# Altium PCB Motion Control PCB.PcbDoc (part 1 of 2)
Units mm, origin at the board's own origin, x right, y up, seen from the top; angles counter-clockwise.
Board outline 100 x 60 mm, 4 copper layers (Top Layer, Signal Layer 1, Signal Layer 2, Bottom Layer), stack 1.642 mm thick; 129 components, 65 nets, 423 pads, 398 vias.
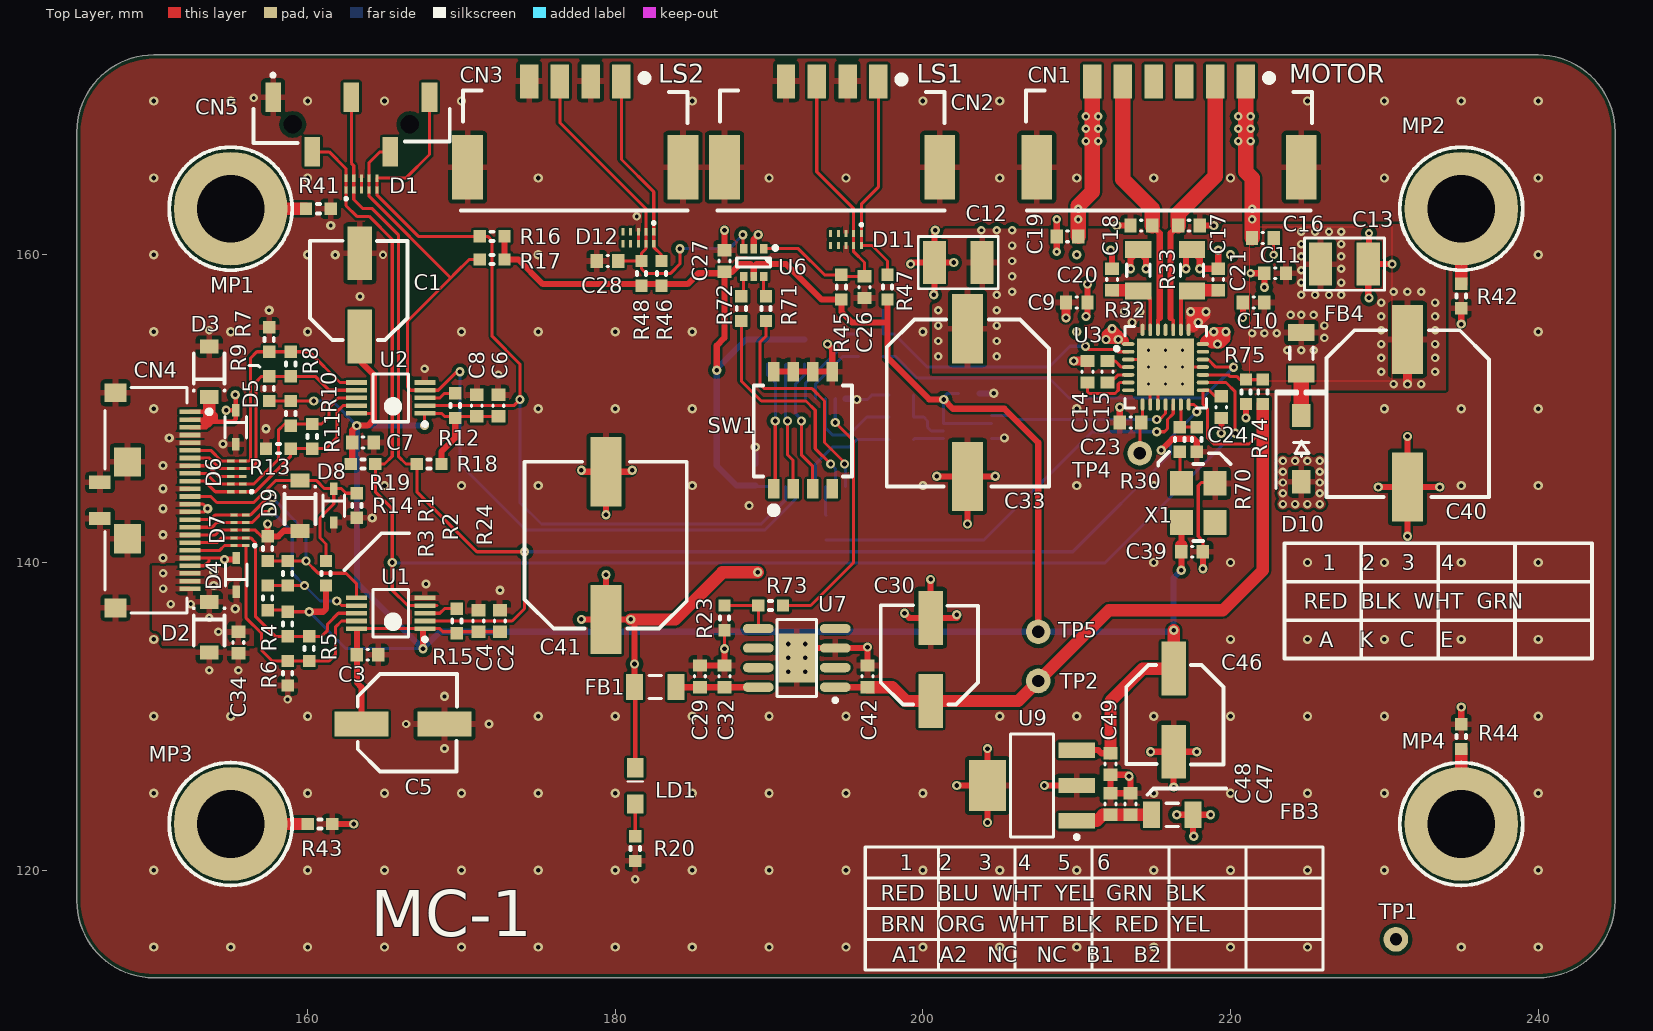
[diagram p0: Top Layer view]
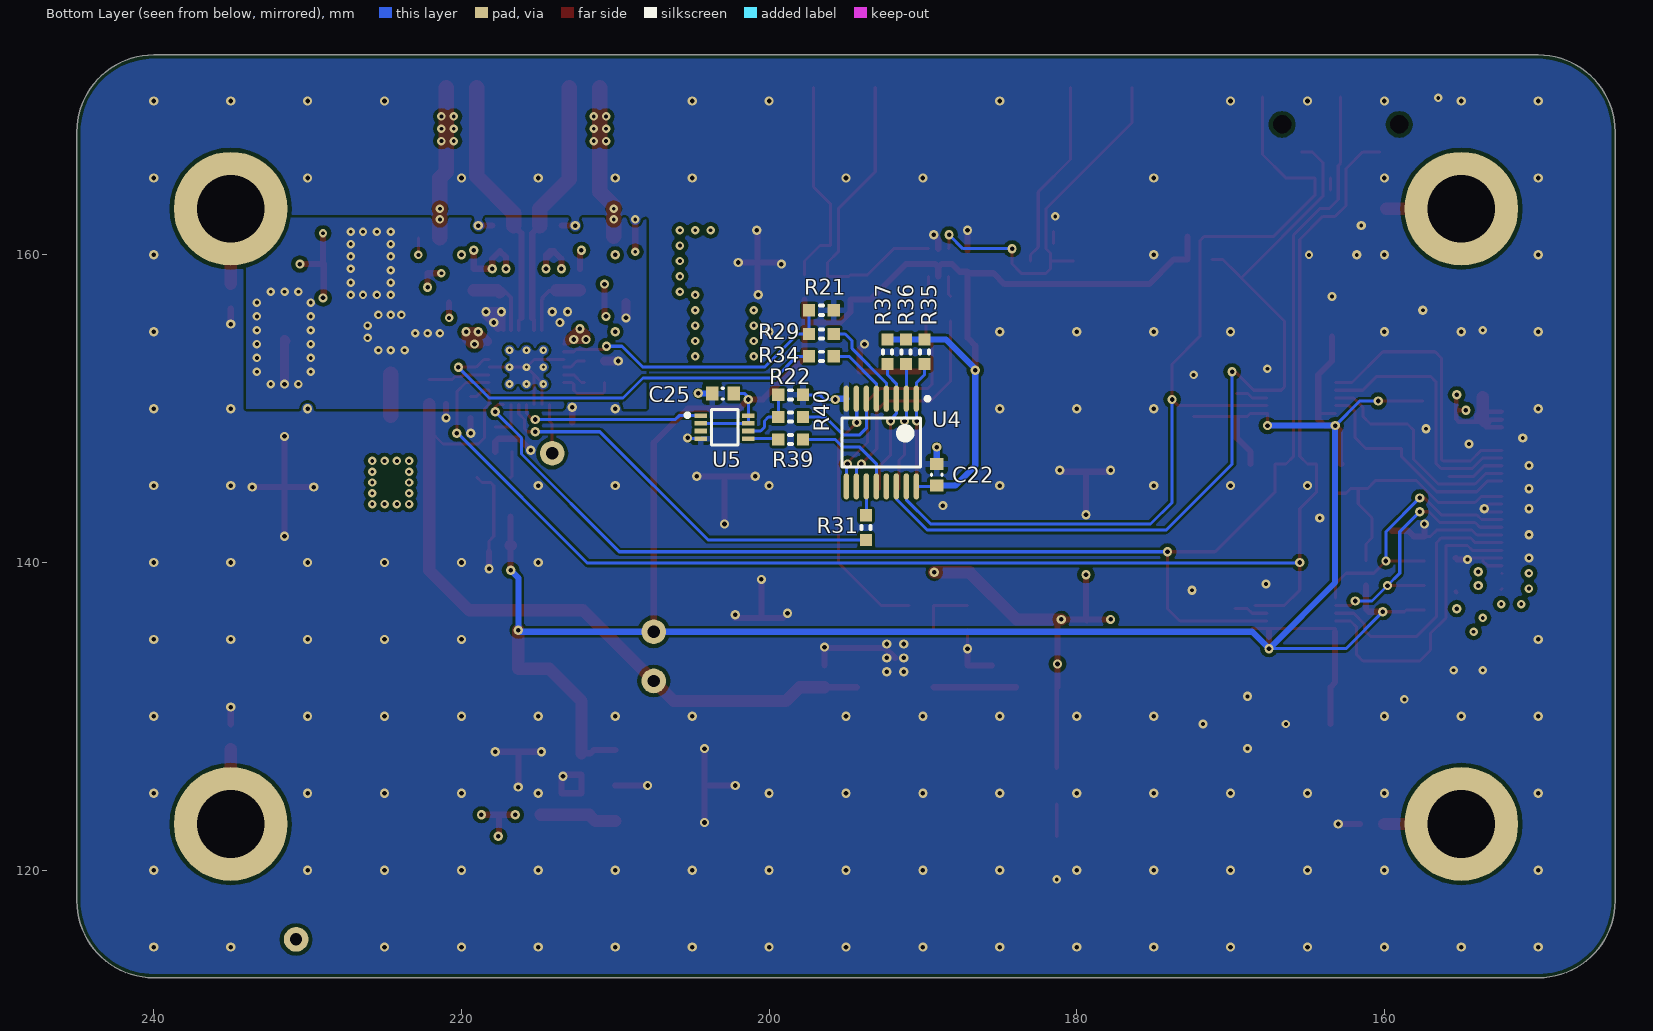
[diagram p1: Bottom Layer view, seen from below]
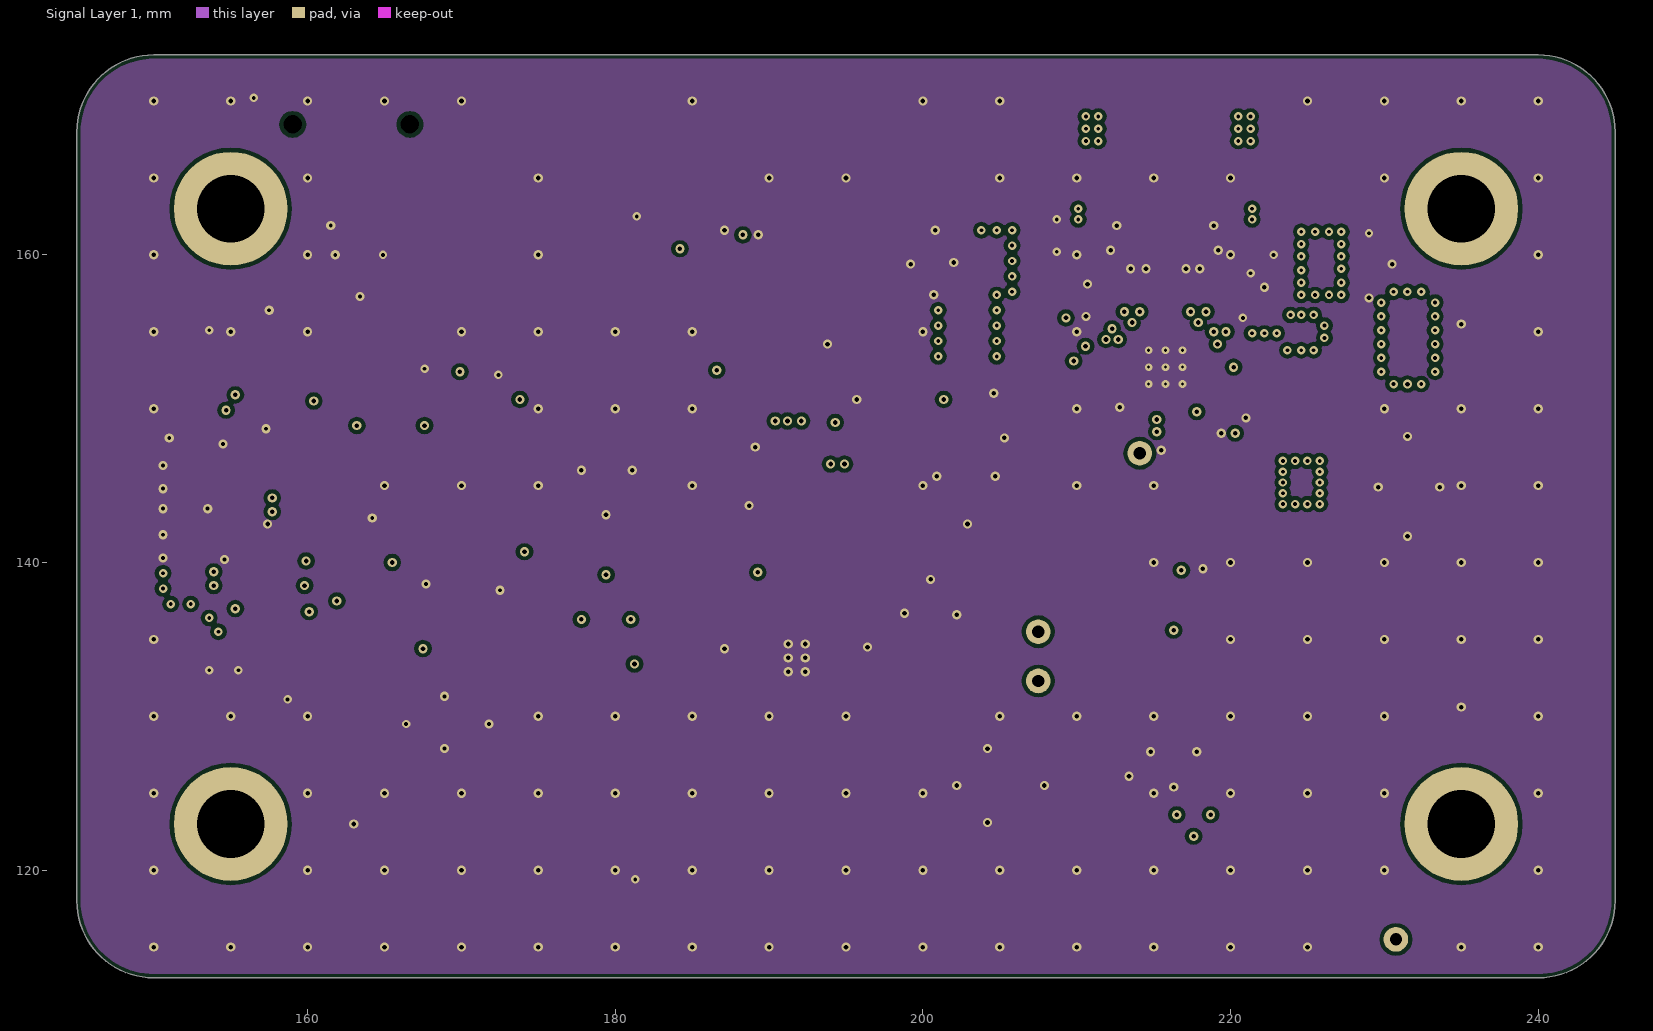
[diagram p2: Signal Layer 1]
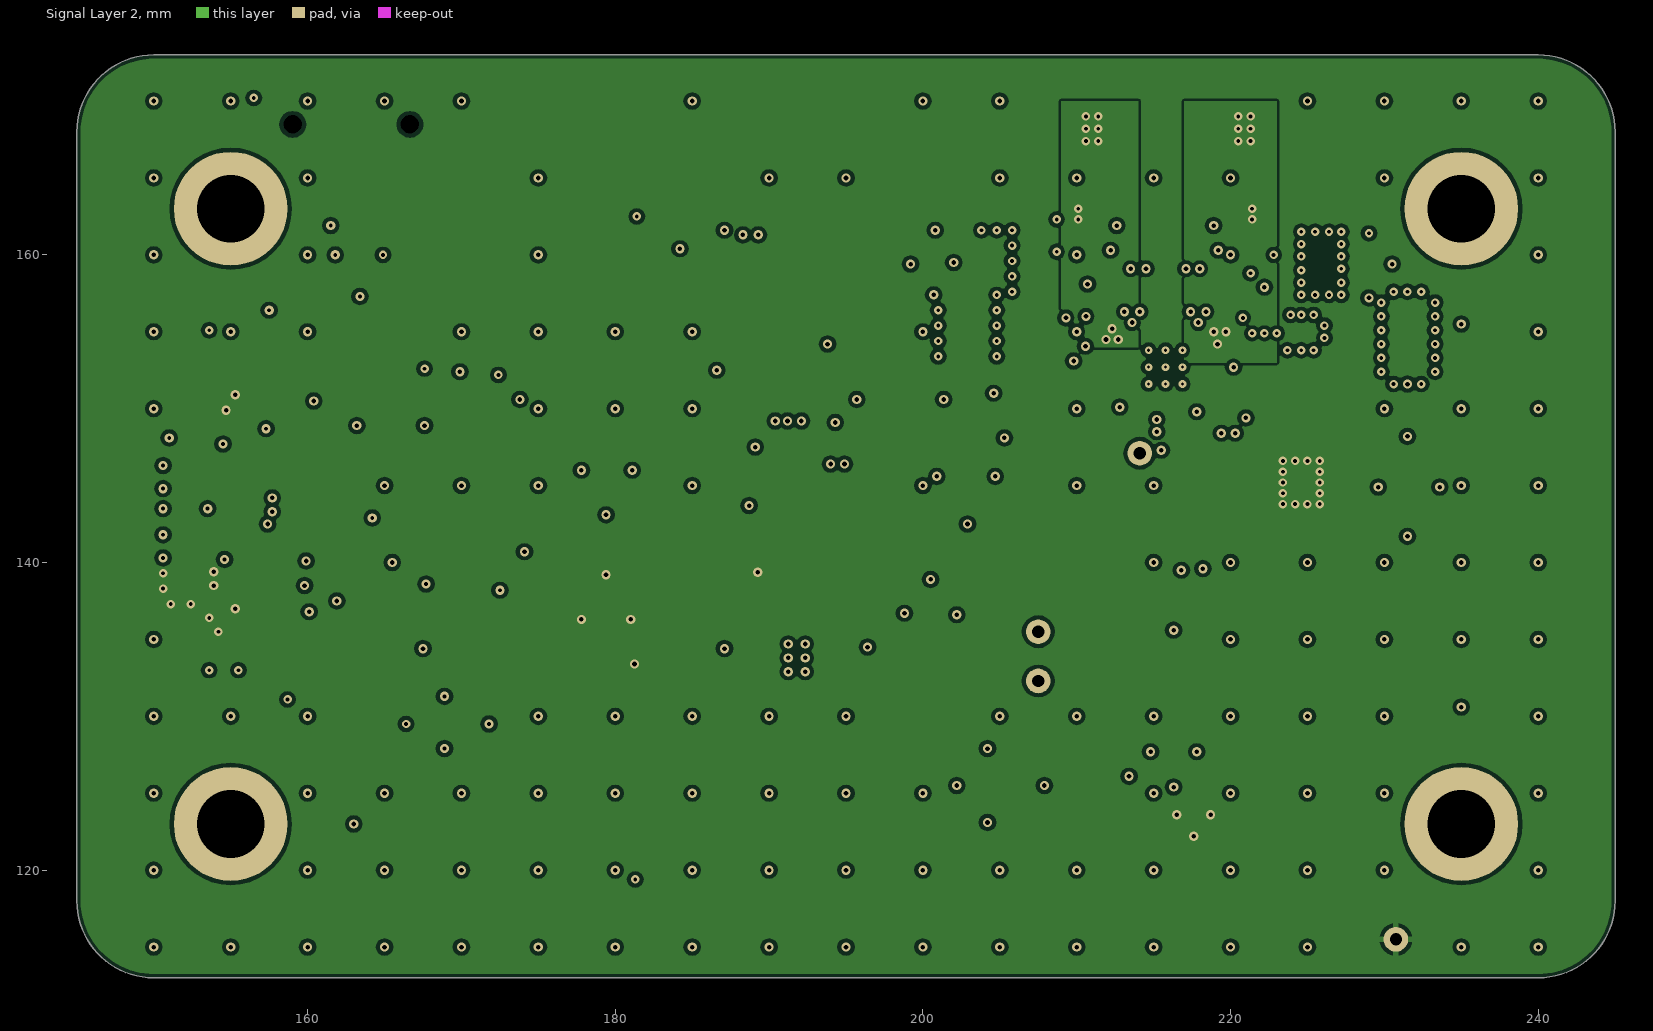
[diagram p3: Signal Layer 2]
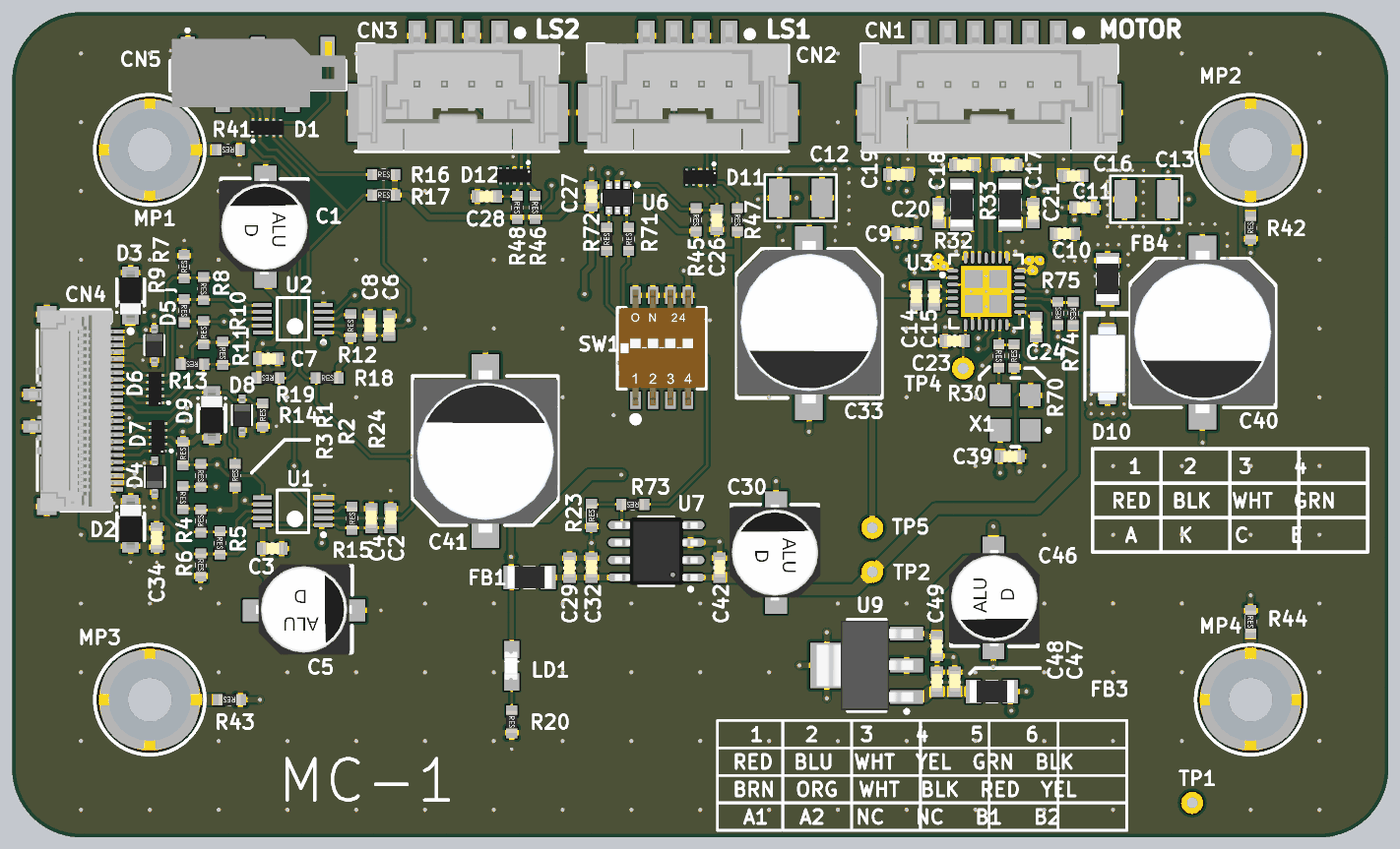
[diagram p5: 3D render of the assembled board from above, using the file's embedded part models]
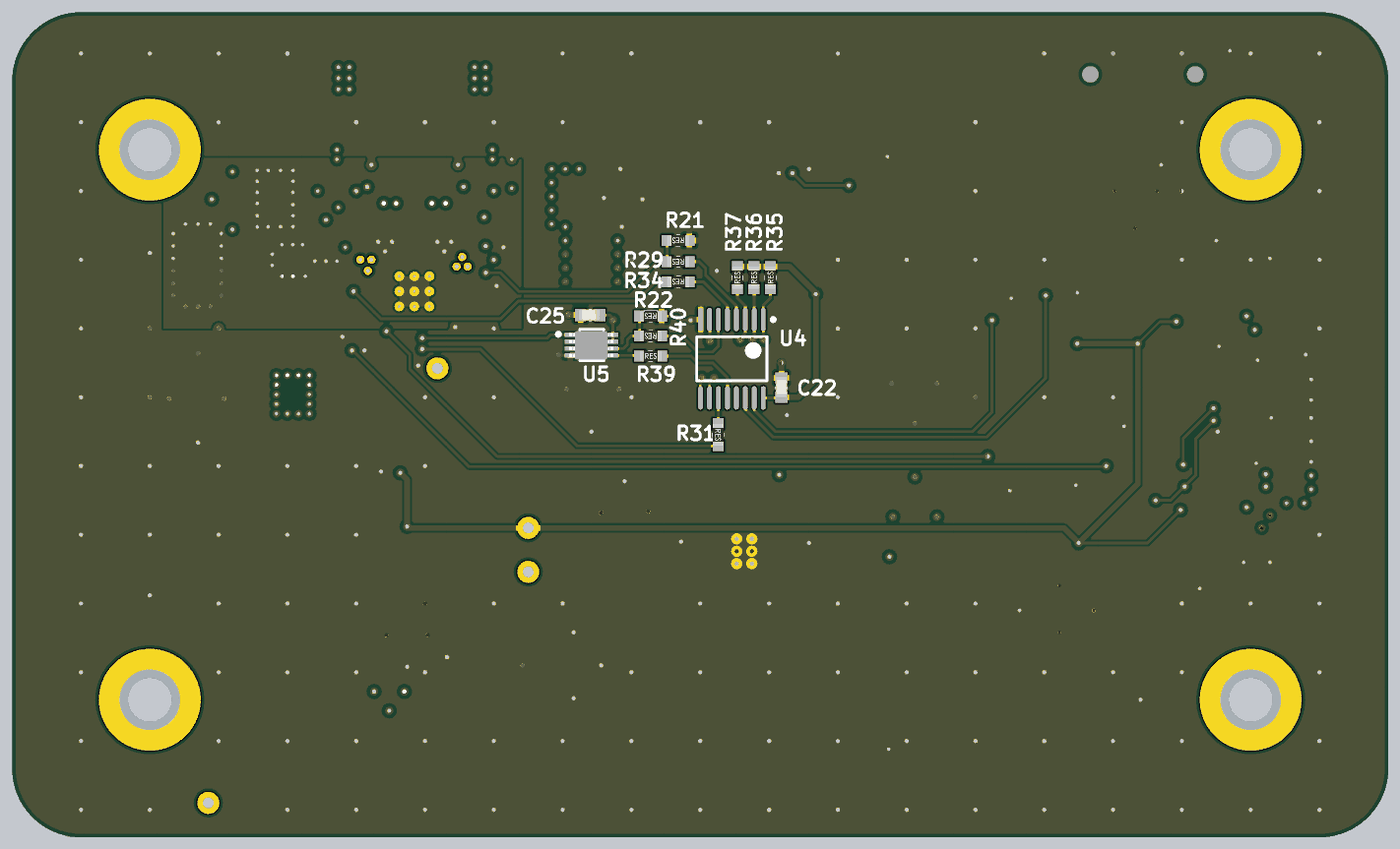
[diagram p6: 3D render of the assembled board from below, using the file's embedded part models]

## Layer stack, top to bottom
Top Solder: solder mask 0.025, Solder Resist, Dk 3.5
Top Layer: signal copper 0.036
Dielectric 1: core 0.17, FR-4, Dk 4.2
Signal Layer 1: signal copper 0.018
Dielectric 3: prepreg 1.194, Dk 4.2
Signal Layer 2: signal copper 0.018
Dielectric 2: core 0.17, Dk 4.2
Bottom Layer: signal copper 0.036
Bottom Solder: solder mask 0.025, Solder Resist, Dk 3.5

## Board outline
145,118 145,168 cw(c150,168) 150,173 240,173 cw(c240,168) 245,168 245,118 cw(c240,118) 240,113 150,113 cw(c150,118)

## Design rules (kind name [scope] priority, off if disabled: settings)
BoardOutlineClearance [All] p1: gap=0.254 ignorepadtopadclearanceinfootprint=FALSE except(0: Arc-SplitContinuation Track-SplitContinuation SMDPad-SplitContinuation THPad-SplitContinuation Via-SplitContinuation Fill-SplitContinuation Poly-SplitContinuation Region-SplitContinuation Text-SplitContinuation)
Clearance Clearance_Hole_Copper [PadXSize_AllLayers <= HoleDiameter] p1: gap=0.254 ignorepadtopadclearanceinfootprint=FALSE except(0: Arc-Hole Track-Hole SMDPad-Hole THPad-Hole Via-Hole Fill-Hole Poly-Hole Region-Hole Text-Hole)
Clearance [All] p2: gap=0.15 ignorepadtopadclearanceinfootprint=FALSE except(0: Arc-Hole Track-Hole SMDPad-Hole THPad-Hole Via-Hole Fill-Hole Poly-Hole Region-Hole Text-Hole; 0.2: Arc-THPad Arc-Via Track-THPad Track-Via SMDPad-THPad SMDPad-Via THPad-THPad THPad-Via Via-Via; 0.254: THPad-Poly Via-Poly Fill-Poly)
DiffPairsRouting [All] p1: maxlimit=0.254 minlimit=0.191 mostfreqgap=0.191 toplayer_mingap=0.191 toplayer_maxgap=0.191 toplayer_minwidth=0.191 toplayer_maxwidth=0.191 toplayer_prefwidth=0.191 midlayer1_prefgap=0.191 midlayer1_minwidth=0.191 midlayer1_maxwidth=0.381 midlayer1_prefwidth=0.191 midlayer2_prefgap=0.191 midlayer2_minwidth=0.191 midlayer2_maxwidth=0.381 midlayer2_prefwidth=0.191 bottomlayer_mingap=0.191 bottomlayer_maxgap=0.191 bottomlayer_minwidth=0.191 bottomlayer_maxwidth=0.191 bottomlayer_prefwidth=0.191 maxuncoupledlength=12.7
HoleSize [All] p1: absolutevalues=TRUE maxlimit=5 minlimit=0.2 maxpercent=80.000 minpercent=20.000
HoleToHoleClearance [All] p1 off: gap=0.254 allowstackedmicrovias=TRUE
MinimumSolderMaskSliver [All] p1 off: minsoldermaskwidth=0.254
NetAntennae [All] p1 off: netantennaetolerance=0
PlaneConnect [All] p1: planeconnectstyle=Relief reliefexpansion=0.2 reliefentries=4 reliefconductorwidth=0.2 reliefairgap=0.15
PolygonConnect PolygonConnect_GND-Vias [IsVia] p1: connectstyle=Direct reliefconductorwidth=0.254 reliefentries=4 polygonreliefangle="90 Angle" airgapwidth=0.254
PolygonConnect [All] p2: connectstyle=Relief reliefconductorwidth=0.4 reliefentries=4 polygonreliefangle="90 Angle" airgapwidth=0.254
RoutingVias [All] p1: holewidth=0.3 width=0.6 viastyle="Through Hole" minholewidth=0.2 minwidth=0.4 maxholewidth=0.3 maxwidth=0.6
SilkToSilkClearance [All] p1 off: silktosilkclearance=0.254
SilkToSolderMaskClearance [IsPad] p1 off: minsilkscreentomaskgap=0.254 clearancetoexposedcopper=TRUE
SolderMaskExpansion [All] p1: expansion=0.102
Width [All] p1: maxlimit=1 minlimit=0.15 preferedwidth=0.2 toplayer_prefwidth=0.15 midlayer1_minwidth=0.2 midlayer2_minwidth=0.2 bottomlayer_prefwidth=0.15 minimp=50.000000 maximp=50.000000 favimp=50.000000
22 further rules are at their usual default settings.

## Classes and differential pairs
component class "Level Shifters": C1 C2 C3 C4 C5 C6 C7 C8 CN5 D1 R1 R2 R3 R4 R5 R6 R7 R8 R9 R10 R11 R12 R13 R15 R16 R17 R18 R19 U1 U2
component class Motion: C9 C10 C11 C12 C13 C14 C15 C16 C17 C18 C19 C20 C21 C22 C23 C24 C25 C33 C39 C40 CN1 D10 FB4 MP1 MP2 MP3 MP4 R21 R22 R29 R30 R31 R32 R33 R34 R35 R36 R37 R39 R40 R41 R42 R43 R44 R70 R74 R75 SW1 TP4 U3 U4 U5 X1
component class "Opto Sensors": C26 C27 C28 CN2 CN3 D11 D12 R45 R46 R47 R48 R71 R72 U6
component class "Power Supplies": C29 C30 C32 C42 C46 C47 C48 C49 FB1 FB3 R23 R73 TP1 TP2 TP5 U7 U9
component class Connector: C34 C41 CN4 D2 D3 D4 D5 D6 D7 D8 D9 LD1 R14 R20 R24

## Components (designator, comment, footprint, x,y, rotation, side; value= is the part's Value field where it differs from the comment)
C1 "47uF 25V Aluminium SMD Capacitor, 20%" RADIAl-CAN-6.3MM-DIA 163.4,157.4 r180 top value=47uF
C2 "4.7uF 0603 Ceramic Capacitor, 10%, 25V" C0603 172.5,136.2 r270 top value=4.7uF
C3 "100nF 0603 Ceramic Capacitor, 10%, X7R, 50V" C0603 163.9,134 r180 top value=100nF
C4 "100nF 0603 Ceramic Capacitor, 10%, X7R, 50V" C0603 171.1,136.2 r270 top value=100nF
C5 "47uF 25V Aluminium SMD Capacitor, 20%" RADIAl-CAN-6.3MM-DIA 166.2,129.5 r90 top value=47uF
C6 "4.7uF 0603 Ceramic Capacitor, 10%, 25V" C0603 172.4,150.2 r270 top value=4.7uF
C7 "100nF 0603 Ceramic Capacitor, 10%, X7R, 50V" C0603 163.6,147.8 r180 top value=100nF
C8 "100nF 0603 Ceramic Capacitor, 10%, X7R, 50V" C0603 171,150.2 r270 top value=100nF
C9 "100nF 0603 Ceramic Capacitor, 10%, X7R, 50V" C0603 210,156.9 r180 top value=100nF
C10 "100nF 0603 Ceramic Capacitor, 10%, X7R, 50V" C0603 221.5,156.9 r0 top value=100nF
C11 "1uF 0603 Ceramic Capacitor, 10%, 50V, X5R" C0603 222.9,158.8 r0 top value=1uF
C12 "10uF 1210 Ceramic Capacitor, 10%, 35V" CAPC3225X22M 202.3,159.5 r180 top value=10uF
C13 "10uF 1210 Ceramic Capacitor, 10%, 35V" CAPC3225X22M 227.4,159.4 r0 top value=10uF
C14 "100nF 0603 Ceramic Capacitor, 10%, X7R, 50V" C0603 210.7,152.4 r90 top value=100nF
C15 "22nF 0603 Ceramic Capacitor, 5%, NP0, 50V" C0603 212,152.4 r90 top value=22nF
C16 "470pF 0603 Ceramic Capacitor, 5%, 100V, C0G" C0603 222.1,161.1 r180 top value=470pF
C17 "470pF 0603 Ceramic Capacitor, 5%, 100V, C0G" C0603 217.3,161.9 r180 top value=470pF
C18 "470pF 0603 Ceramic Capacitor, 5%, 100V, C0G" C0603 214.2,161.9 r0 top value=470pF
C19 "470pF 0603 Ceramic Capacitor, 5%, 100V, C0G" C0603 209.4,161.2 r0 top value=470pF
C20 "100nF 0603 Ceramic Capacitor, 10%, X7R, 50V" C0603 212.3,158.4 r270 top value=100nF
C21 "100nF 0603 Ceramic Capacitor, 10%, X7R, 50V" C0603 219.2,158.4 r270 top value=100nF
C22 "100nF 0603 Ceramic Capacitor, 10%, X7R, 50V" C0603 189.1,145.7 r270 bottom value=100nF
C23 "4.7uF 0603 Ceramic Capacitor, 10%, 25V" C0603 213.5,149.1 r0 top value=4.7uF
C24 "100nF 0603 Ceramic Capacitor, 10%, X7R, 50V" C0603 219.4,150.1 r90 top value=100nF
C25 "100nF 0603 Ceramic Capacitor, 10%, X7R, 50V" C0603 203,150.979 r180 bottom value=100nF
C26 "100nF 0603 Ceramic Capacitor, 10%, X7R, 50V" C0603 196.2,157.9 r90 top value=100nF
C27 "100nF 0603 Ceramic Capacitor, 10%, X7R, 50V" C0603 187.1,159.6 r270 top value=100nF
C28 "100nF 0603 Ceramic Capacitor, 10%, X7R, 50V" C0603 179.5,159.6 r0 top value=100nF
C29 "4.7uF 0603 Ceramic Capacitor, 10%, 25V" C0603 185.5,132.6 r270 top value=4.7uF
C30 "CAP ALUM 270UF 20% 16V SMD" RADIAl-CAN-6.3MM-DIA 200.5,133.7 r180 top value=270uF
C32 "100nF 0603 Ceramic Capacitor, 10%, X7R, 50V" C0603 187.1,132.6 r270 top value=100nF
C33 "HYBRID SMD, 35V390UF 125DEGC 400" RADIAl-CAN-10MM-DIA 202.9,150.4 r0 top value=390uF
C34 "100nF 0603 Ceramic Capacitor, 10%, X7R, 50V" C0603 155.5,134.8 r90 top value=100nF
C39 "100nF 0603 Ceramic Capacitor, 10%, X7R, 50V" C0603 217.5,140.7 r180 top value=100nF
C40 "HYBRID SMD, 35V390UF 125DEGC 400" RADIAl-CAN-10MM-DIA 231.5,149.7 r0 top value=390uF
C41 "HYBRID SMD, 35V390UF 125DEGC 400" RADIAl-CAN-10MM-DIA 179.4,141.1 r180 top value=390uF
C42 "100nF 0603 Ceramic Capacitor, 10%, X7R, 50V" C0603 196.4,132.6 r270 top value=100nF
C46 "CAP ALUM 270UF 20% 16V SMD" RADIAl-CAN-6.3MM-DIA 216.3,130.4 r0 top value=270uF
C47 "0.47uF 0603 Ceramic Capacitor, 10%, 25V, X7R" C0603 213.5,124.3 r270 top value=0.47uF
C48 "100nF 0603 Ceramic Capacitor, 10%, X7R, 50V" C0603 212.2,124.3 r270 top value=100nF
C49 "100nF 0603 Ceramic Capacitor, 10%, X7R, 50V" C0603 212.2,126.9 r90 top value=100nF
CN1 "560020-0620" 5600200620 216,171.28 r0 top
CN2 "560020-0420" 5600200420 194.1,171.28 r0 top
CN3 "560020-0420" 5600200420 177.4,171.28 r0 top
CN4 "5022442430" 5022312400 152.36,144.04 r270 top
CN5 "1x5 Way 2.54mm Pitch SMT Socket" SSM-105-L-SV-P-TR 162.84,168.477 r0 top
D1 "TVS DIODE 5.5V 4.6V 10DFN2510" DFN2510A-10 163.5,164.6 r0 top
D2 "AQHV15-01ETG" sod-123f 153.6,135.8 r90 top
D3 "AQHV15-01ETG" sod-123f 153.6,152.4 r270 top
D4 "CDSOD323-T15S" SOD323 155.36,139.19 r90 top
D5 "CDSOD323-T15S" SOD323 155.33,148.79 r270 top
D6 "TVS DIODE 5.5V 4.6V 10DFN2510" DFN2510A-10 155.4,145.6 r90 top
D7 "TVS DIODE 5.5V 4.6V 10DFN2510" DFN2510A-10 155.6,142.1 r90 top
D8 "CDSOD323-T05S" SOD323 161.7,143.7 r270 top
D9 "DIODE ZENER 5.1V 500MW SOD123F" sod-123f 159.5,143.7 r90 top
D10 "VSSAF3N50-M3_6A" DO221AC-SLIMSMA 224.6,147.4 r90 top
D11 "TVS DIODE 5.5V 4.6V 10DFN2510" DFN2510A-10 195,161 r180 top
D12 "TVS DIODE 5.5V 4.6V 10DFN2510" DFN2510A-10 181.5,161.112 r180 top
FB1 "FERRITE BEAD 390 OHM 1206 1LN" R1206 182.6,131.9 r0 top value="390R @ 100MHz"
FB3 "FERRITE BEAD 390 OHM 1206 1LN" R1206 216.2,123.6 r180 top value="390R @ 100MHz"
FB4 "FERRITE BEAD 390 OHM 1206 1LN" R1206 224.6,153.6 r270 top value="390R @ 100MHz"
LD1 "0805 Red/Green LED" LED-0805 181.3,125.475 r270 top value=Red/Green
MP1 "6.6mm (5mm Clearance) M3 Spacer" 9775066960R 155,163 r0 top
MP2 "6.6mm (5mm Clearance) M3 Spacer" 9775066960R 235,163 r0 top
MP3 "6.6mm (5mm Clearance) M3 Spacer" 9775066960R 155,123 r0 top
MP4 "6.6mm (5mm Clearance) M3 Spacer" 9775066960R 235,123 r0 top
R1 "1k5 0603 Chip Resistor, 5%, 0.1W" R0603 157.4,140.9 r90 top value=1k5
R2 "120R 0603 Chip Resistor, 1%, 0.1W" R0603 158.7,139.3 r270 top value=120R
R3 "1k5 0603 Chip Resistor, 5%, 0.1W" R0603 157.4,137.7 r270 top value=1k5
R4 "1k5 0603 Chip Resistor, 5%, 0.1W" R0603 158.7,136 r90 top value=1k5
R5 "120R 0603 Chip Resistor, 1%, 0.1W" R0603 160.1,134.4 r270 top value=120R
R6 "1k5 0603 Chip Resistor, 5%, 0.1W" R0603 158.7,132.8 r270 top value=1k5
R7 "1k5 0603 Chip Resistor, 5%, 0.1W" R0603 157.5,154.5 r90 top value=1k5
R8 "120R 0603 Chip Resistor, 1%, 0.1W" R0603 158.9,152.9 r270 top value=120R
R9 "1k5 0603 Chip Resistor, 5%, 0.1W" R0603 157.5,151.3 r270 top value=1k5
R10 "1k5 0603 Chip Resistor, 5%, 0.1W" R0603 158.9,149.7 r90 top value=1k5
R11 "120R 0603 Chip Resistor, 1%, 0.1W" R0603 160.3,148.2 r270 top value=120R
R12 "10k 0603 Chip Resistor, 1%, 0.1W" R0603 169.6,150.2 r90 top value=10k
R13 "1k5 0603 Chip Resistor, 5%, 0.1W" R0603 158.1,147.4 r180 top value=1k5
R14 "4k7 0603 Chip Resistor, 1%, 0.1W" R0603 163.2,143.7 r90 top value=4k7
R15 "10k 0603 Chip Resistor, 1%, 0.1W" R0603 169.7,136.2 r90 top value=10k
R16 "4k7 0603 Chip Resistor, 1%, 0.1W" R0603 172,161.2 r0 top value=4k7
R17 "4k7 0603 Chip Resistor, 1%, 0.1W" R0603 172,159.7 r0 top value=4k7
R18 "22k 0603 Chip Resistor, 1%, 0.1W" R0603 167.9,146.4 r0 top value=22k
R19 "22k 0603 Chip Resistor, 1%, 0.1W" R0603 163.6,146.4 r180 top value=22k
R20 "1k5 0603 Chip Resistor, 5%, 0.1W" R0603 181.3,121.4 r270 top value=1k5
R21 "10k 0603 Chip Resistor, 1%, 0.1W" R0603 196.6,156.4 r0 bottom value=10k
R22 "10k 0603 Chip Resistor, 1%, 0.1W" R0603 198.6,150.9 r0 bottom value=10k
R23 "10k 0603 Chip Resistor, 1%, 0.1W" R0603 187.1,136.4 r90 top value=10k
R24 "100R 0603 Chip Resistor, 1%, 0.1W" R0603 161.2,139.3 r90 top value=100R
R29 "100R 0603 Chip Resistor, 1%, 0.1W" R0603 196.6,154.854 r0 bottom value=100R
R30 "0R 0603 Chip Resistor" R0603 216.7,148 r270 top value=0R
R31 "100R 0603 Chip Resistor, 1%, 0.1W" R0603 193.7,142.269 r270 bottom value=100R
R32 "110mR 1206 Chip Resistor, 1%, 0.5W" R1206 214,159 r90 top value=110mR
R33 "110mR 1206 Chip Resistor, 1%, 0.5W" R1206 217.5,159 r270 top value=110mR
R34 "100R 0603 Chip Resistor, 1%, 0.1W" R0603 196.6,153.4 r0 bottom value=100R
R35 "10k 0603 Chip Resistor, 1%, 0.1W" R0603 189.9,153.7 r90 bottom value=10k
R36 "10k 0603 Chip Resistor, 1%, 0.1W" R0603 191.1,153.7 r90 bottom value=10k
R37 "10k 0603 Chip Resistor, 1%, 0.1W" R0603 192.3,153.7 r90 bottom value=10k
R39 "100R 0603 Chip Resistor, 1%, 0.1W" R0603 198.6,148 r180 bottom value=100R
R40 "100R 0603 Chip Resistor, 1%, 0.1W" R0603 198.6,149.454 r0 bottom value=100R
R41 "0R 0603 Chip Resistor" R0603 160.7,163 r180 top value=0R
R42 "0R 0603 Chip Resistor" R0603 235,157.319 r90 top value=0R
R43 "0R 0603 Chip Resistor" R0603 160.8,123 r180 top value=0R
R44 "0R 0603 Chip Resistor" R0603 235,128.681 r270 top value=0R
R45 "4k7 0603 Chip Resistor, 1%, 0.1W" R0603 194.7,157.9 r270 top value=4k7
R46 "100R 0603 Chip Resistor, 1%, 0.1W" R0603 183,158.8 r270 top value=100R
R47 "100R 0603 Chip Resistor, 1%, 0.1W" R0603 197.7,157.9 r270 top value=100R
R48 "4k7 0603 Chip Resistor, 1%, 0.1W" R0603 181.7,158.8 r270 top value=4k7
R70 "0R 0603 Chip Resistor" R0603 217.8,148 r90 top value=0R
R71 "100R 0603 Chip Resistor, 1%, 0.1W" R0603 189.8,156.5 r90 top value=100R
R72 "100R 0603 Chip Resistor, 1%, 0.1W" R0603 188.2,156.5 r90 top value=100R
R73 "100R 0603 Chip Resistor, 1%, 0.1W" R0603 190.1,137.2 r180 top value=100R
R74 "20k 0603 Chip Resistor, 1%, 0.1W" R0603 222.1,151.1 r270 top value=20k
R75 "20k 0603 Chip Resistor, 1%, 0.1W" R0603 221,151.1 r90 top value=20k
SW1 "SWITCH SLIDE DIP SPST 25MA 24V" 218-4LPST 192.2,148.6 r0 top
TP1 "Test Point PTH" "Solder Point - 0.8mm Drill" 230.75,115.5 r0 top
TP2 "Test Point PTH" "Solder Point - 0.8mm Drill" 207.5,132.3 r90 top
TP4 "Test Point PTH" "Solder Point - 0.8mm Drill" 214.1,147.1 r90 top
TP5 "Test Point PTH" "Solder Point - 0.8mm Drill" 207.5,135.5 r90 top
U1 "PCA9615DPJ" TSSOP50P490X110-10N 165.4,136.7 r180 top
U2 "PCA9615DPJ" TSSOP50P490X110-10N 165.4,150.7 r180 top
U3 "TMC2209-LA-T" QFN50P500X500X90_HS-29N 215.775,152.7 r0 top
U4 "TCA9554APWR" PW16_N 192.7,147.8 r270 bottom
U5 "SN74LVC2G74DCUR" VSSOP8 202.9,148.8 r180 bottom
U6 "74LVC2G14GW Dual Schmitt Trigger Inverter" SOT-363 189,159.5 r270 top
U7 "BD50FC0WEFJ-E2" SO8_N-EP-ROHM 191.8,133.8 r180 top
U9 "LM2940IMP-5.0/NOPB" SOT223 207.1,125.5 r180 top
X1 "16MHz XO (Standard) CMOS Oscillator 4.5V ~ 5.5V Enable/Disable 4-SMD, No Lead" SG5032 219,142.6 r90 top value=16MHz

## Footprints (in the part's own frame and the unit in brackets; to place one, negate y for a bottom-side part, rotate by r counter-clockwise, add the part's x,y. Pads: shape width x height; smd on the part's side, far side on the other; paste and mask are expansions set on the pad)
218-4LPST [mm]
  rect 0.76x1.27 smd: 1(-1.905,-3.81) 2(-0.635,-3.81) 3(0.635,-3.81) 4(1.905,-3.81) 5(1.905,3.81) 6(0.635,3.81) 7(-0.635,3.81) 8(-1.905,3.81)
  silkscreen extent -3.2,-5.4 3.2,2.9, body extent -3.12,-4.22 3.13,4.22, height 2.57
5022312400 [mm]
  rect 0.3x1.37 smd: 1(-5.75,0) 2(-5.25,0) 3(-4.75,0) 4(-4.25,0) 5(-3.75,0) 6(-3.25,0) 7(-2.75,0) 8(-2.25,0) 9(-1.75,0) 10(-1.25,0) 11(-0.75,0) 12(-0.25,0) 13(0.25,0) 14(0.75,0) 15(1.25,0) 16(1.75,0) 17(2.25,0) 18(2.75,0) 19(3.25,0) 20(3.75,0) 21(4.25,0) 22(4.75,0) 23(5.25,0) 24(5.75,0)
  rect 1.22x1.4 smd: 25(-6.99,-4.85) 28(6.99,-4.85)
  rect 0.85x1.4 smd: 26(-1.175,-5.86) 27(1.175,-5.86)
  rect 1.9x1.75 smd: 29(-2.5,-4.07) 30(2.5,-4.07)
  silkscreen extent -7.33,-5.53 7.33,1.28, body extent -7.27,-6.17 7.33,0.29, height 2.32
5600200420 [mm] "5600200420"
  rect 1.2x2.2 smd: 1(3,0) 2(1,0) 3(-1,0) 4(-3,0)
  rect 2x4.2 smd: MP1(-7,-5.58) MP2(7,-5.58)
  silkscreen extent -7.45,-8.4 7.3,0.32, body extent -7.3,-8.36 7.3,0.79, height 8
5600200620 [mm] "5600200620"
  rect 1.2x2.2 smd: 1(5,0) 2(3,0) 3(1,0) 4(-1,0) 5(-3,0) 6(-5,0)
  rect 2x4.2 smd: MP1(-8.6,-5.58) MP2(8.6,-5.58)
  silkscreen extent -9.3,-8.4 9.3,0.42, body extent -9.3,-8.4 9.3,0.75, height 8
9775066960R [mm] "Wurth Standoff, 1mm"
  round 7.4 hole 4.4 unplated: 1(0,0)
  silkscreen extent -4,-4 4,4, body extent -3,-3 3,3, height 1
C0603 [mm] "Chip Capacitor, Body 1.6x0.8mm, IPC High Density"
  rect 0.8x0.9 smd: 1(-0.7,0) 2(0.7,0)
  silkscreen extent -0.05,-0.35 0.05,0.35, body extent -0.85,-0.41 0.75,0.41, height 0.82
CAPC3225X22M [mm] "Chip Capacitor, 2-Leads, Body 3.2x2.5mm, IPC Low Density"
  rect 1.5x2.8 smd: 1(-1.55,0) 2(1.55,0)
  silkscreen extent -2.6,-1.7 2.6,1.7, body extent -1.7,-1.25 1.7,1.25, height 1.8
DFN2510A-10 [mm]
  rect 0.2x0.475 smd mask+0.05: 1(-1,-0.387) 2(-0.5,-0.387) 3(0,-0.387) 4(0.5,-0.387) 5(1,-0.387) 6(1,0.387) 7(0.5,0.387) 8(0,0.387) 9(-0.5,0.387) 10(-1,0.387)
  silkscreen extent -1.06,-1.02 -0.94,-0.9, body extent -1.25,-0.5 1.25,0.5, height 0.5
DO221AC-SLIMSMA [mm]
  rect 1.52x1.2 smd: 1(-2.16,0) 2(2.16,0)
  silkscreen extent -2.6,-1.65 3.75,1.65, body extent -2.63,-1.29 2.69,1.29, height 1.05
LED-0805 [mm]
  round 0.254 on Mech15: 0(0,0)
  rect 1.25x1.1 smd: 1(-1.175,0) 2(1.175,0)
  silkscreen extent -0.3,-0.5 -0.3,0.5, body extent -1.03,-0.51 1.03,0.4, height 0.85
PW16_N [mm] "TSOP, 16-Leads, Body 5x4.4mm, Pitch 0.65mm, IPC Medium Density"
  oval 1.7x0.35 smd: 1(-2.85,2.275) 2(-2.85,1.625) 3(-2.85,0.975) 4(-2.85,0.325) 5(-2.85,-0.325) 6(-2.85,-0.975) 7(-2.85,-1.625) 8(-2.85,-2.275) 9(2.85,-2.275) 10(2.85,-1.625) 11(2.85,-0.975) 12(2.85,-0.325) 13(2.85,0.325) 14(2.85,0.975) 15(2.85,1.625) 16(2.85,2.275)
  silkscreen extent -2.97,-2.55 1.6,3.12, body extent -2.25,-2.55 2.25,2.55, height 1.2
QFN50P500X500X90_HS-29N [mm] "QFN, 28-Leads, Body 5.00x5.00mm, Pitch 0.50mm, Thermal Pad 3.70x3.70mm, IPC Medium Density"
  oval 0.8x0.25 smd: 1(-2.425,1.5) 2(-2.425,1) 3(-2.425,0.5) 4(-2.425,0) 5(-2.425,-0.5) 6(-2.425,-1) 7(-2.425,-1.5) 15(2.425,-1.5) 16(2.425,-1) 17(2.425,-0.5) 18(2.425,0) 19(2.425,0.5) 20(2.425,1) 21(2.425,1.5)
  oval 0.25x0.8 smd: 8(-1.5,-2.425) 9(-1,-2.425) 10(-0.5,-2.425) 11(0,-2.425) 12(0.5,-2.425) 13(1,-2.425) 14(1.5,-2.425) 22(1.5,2.425) 23(1,2.425) 24(0.5,2.425) 25(0,2.425) 26(-0.5,2.425) 27(-1,2.425) 28(-1.5,2.425)
  rect 3.7x3.7 smd paste-5: 29(0,0)
  silkscreen extent -3.3,-2.65 2.65,2.65, body extent -2.5,-2.5 2.5,2.5, height 0.9
R0603 [mm] "Chip Resistor, Body 1.6x0.8mm, IPC High Density"
  rect 0.8x0.8 smd: 1(-0.8,0) 2(0.8,0)
  silkscreen extent -0.1,-0.3 0.1,0.3, body extent -0.8,-0.4 0.8,0.4, height 0.45
R1206 [mm]
  rect 1.1x1.7 smd: 1(-1.35,0) 2(1.35,0)
  silkscreen extent -0.4,-0.75 0.4,0.75, body extent -1.6,-0.8 1.6,0.8, height 0.6
RADIAl-CAN-6.3MM-DIA [mm] "Radial Can 6.3mm Diameter"
  rect 1.6x3.5 smd: +(0,2.7) -(0,-2.7)
  silkscreen extent -3.08,-3.52 3.24,2.94, body extent -3.23,-3.51 3.37,3.49, height 5.4
RADIAl-CAN-10MM-DIA [mm] "Radial Can 10mm Diameter"
  rect 2x4.5 smd: +(0,4.8) -(0,-4.8)
  silkscreen extent -5.25,-5.45 5.3,5.4, body extent -5.25,-5.85 5.25,5.95, height 10.3
SG5032 [mm] "SG5032"
  round 0.5 on Top Overlay: 0(0,-1.3)
  rect 1.6x1.5 smd: 1(0,0) 2(2.54,0) 3(2.54,2.2) 4(0,2.2)
  silkscreen extent -1.2,0.8 3.8,1.4, body extent -1.2,-0.5 3.8,2.7, height 1.1
SO8_N-EP-ROHM [mm] "SOIC, 8-Leads, Body 4.9x3.9mm, Pitch 1.27mm, IPC Medium Density, Exposed Pad"
  oval 2x0.6 smd: 1(-2.5,1.905) 2(-2.5,0.635) 3(-2.5,-0.635) 4(-2.5,-1.905) 5(2.5,-1.905) 6(2.5,-0.635) 7(2.5,0.635) 8(2.5,1.905)
  rect 2.4x3.2 smd paste-10: 9(0,0)
  silkscreen extent -2.63,-2.5 1.28,2.88, body extent -3.01,-2.44 2.99,2.46, height 1.7
SOD323 [mm]
  rect 0.8x0.5 smd: 1(-1.1,0) 2(1.1,0)
  silkscreen extent -0.7,-0.7 0.7,0.7, body extent -1.3,-0.67 1.3,0.67, height 1.1
sod-123f [mm]
  rect 0.91x1.22 smd: A(-1.64,0) C(1.64,0)
  silkscreen extent -1.2,-1.03 1.25,1.02, body extent -1.8,-0.8 1.9,0.8, height 1.27
"Solder Point - 0.8mm Drill" [mm]
  round 1.6 hole 0.8: 1(0,0)
SOT223 [mm] "SOT223, 4-Leads, Body 6.5x3.5mm, Pitch 2.3mm, Lead Span 7mm, IPC Medium Density"
  rect 2.4x1 smd: 1(-2.9,2.3) 2(-2.9,0) 3(-2.9,-2.3)
  rect 2.4x3.3 smd: 4(2.9,0)
  silkscreen extent -3.03,-3.35 1.4,3.47, body extent -3.37,-3.25 3.63,3.25, height 1.65
SOT-363 [mm] "SOT363, 6-Leads, Body 2.00x2.10mm, Pitch 0.65mm, IPC Medium Density"
  rect 0.6x0.5 smd: 1(-0.9,0.65) 3(-0.9,-0.65) 4(0.9,-0.65) 6(0.9,0.65)
  rect 0.6x0.4 smd: 2(-0.9,0) 5(0.9,0)
  silkscreen extent -1.07,-1.1 0.3,1.54, body extent -1.06,-1.1 1.06,1.1, height 1.05
SSM-105-L-SV-P-TR [mm]
  round 0 hole 1.2 unplated: 0(-3.81,0) 0(3.81,0)
  rect 1.02x1.905 smd: 1(-5.08,1.777) 2(-2.54,-1.777) 3(0,1.777) 4(2.54,-1.777) 5(5.08,1.777)
  silkscreen extent -6.35,-1.2 6.4,3.3, body extent -6.3,-2.38 6.4,2.58, height 8.64
TSSOP50P490X110-10N [mm] "TSSOP, 10-Leads, Body 3.00x3.00mm, Pitch 0.50mm, IPC Medium Density"
  rect 1.35x0.3 smd: 1(-2.225,1) 2(-2.225,0.5) 3(-2.225,0) 4(-2.225,-0.5) 5(-2.225,-1) 6(2.225,-1) 7(2.225,-0.5) 8(2.225,0) 9(2.225,0.5) 10(2.225,1)
  silkscreen extent -2.35,-1.55 1.15,1.82, body extent -1.55,-1.55 1.55,1.55, height 1.1
VSSOP8 [mm]
  rect 0.8x0.3 smd mask+0.05: 1(-1.55,0.75) 2(-1.55,0.25) 3(-1.55,-0.25) 4(-1.55,-0.75) 5(1.55,-0.75) 6(1.55,-0.25) 7(1.55,0.25) 8(1.55,0.75)
  silkscreen extent -2.54,-1.15 0.89,1.14, body extent -1.62,-1.07 1.58,1.03, height 0.9

## Part data
C1 C5: Manufacturer="Panasonic Electronic Components", ManufacturerPN=25SVPF47M, Tolerance=20%, Voltage=25V, Cost=1.06, Cost-10000=0.3, Supplier1=Digikey, Supplier1PN=P16513TR-ND, Supplier1PNProto=P16513CT-ND, Supplier2="Open Market"
C2 C6 C23 C29: library part "4.7uF 0603 Ceramic Capacitor, 10%, 25V_1", Flex Part Number=ROL-F120-0783, Manufacturer="Samsung Electro-Mechanics America, Inc", ManufacturerPN=CL10A475KA8NQNC, Package=0603, Tolerance=10%, Voltage=25V, Cost=0.22, Cost-10000=0.04744, Supplier1=Digikey, Supplier1PN=1276-1900-2-ND, Supplier1PNProto=1276-1900-1-ND, Supplier2="Open Market"
C3 C4 C7 C8 C9 C10 C14 C20 C21 C22 C24 C25 C26 C27 C28 C32 C34 C39 C42 C48 C49: Manufacturer=AVX, ManufacturerPN=06035C104KAZ2A, Package=0603, Tolerance=10%, Voltage=50V, Cost=0.0671, Cost-10000=0.0192, Supplier1=Farnell, Supplier1PN=1301894, Supplier1PNProto=1301894, Supplier2="Open Market"
C11: Manufacturer="Taiyo Yuden", ManufacturerPN=UMK107BJ105KA-T, Package=0603, Tolerance=10%, Voltage Rating=50V, Cost=0.11, Cost-10000=0.0227, CreatedBy=AT, Supplier1=Farnell, Supplier1PN=2112858, Supplier1PNProto=2112858, Supplier2="Open Market"
C12 C13: Flex Part Number=ROL-F120-0801, Manufacturer="Samsung Electro-Mechanics America", ManufacturerPN=CL32A106KLULNNE, Package=1210, Tolerance=10%, Voltage=35V, Cost=0.57, Cost-10000=0.08827, Supplier1=Digikey, Supplier1PN=1276-3307-2-ND, Supplier1PNProto=1276-3307-1-ND, Supplier2="Open Market"
C15: Manufacturer="Samsung Electro-Mechanics America, Inc", ManufacturerPN=CL10B223JB8NNNC, Package=0603, Tolerance=5%, Voltage=50V, Cost=0.2, Cost-10000=0.03947, Supplier1=Digikey, Supplier1PN=1276-1996-2-ND, Supplier1PNProto=1276-1996-1-ND, Supplier2="Open Market"
C16 C17 C18 C19: Manufacturer="Murata Electronics", ManufacturerPN=GCM1885C2A471JA16D, Package=0603, Tolerance=5%, Voltage Rating=100V, Cost=0.17, Cost-10000=0.01, CreatedBy=AT, Supplier1=Digikey, Supplier1PN=490-4949-2-ND, Supplier1PNProto=490-4949-1-ND
C30 C46: "270µF 16V Aluminum Polymer Capacitor Radial, Can - SMD 10mOhm 5000 Hrs @ 105°C", Manufacturer="Panasonic Electronic Components", ManufacturerPN=16SVPG270MX, Tolerance=20%, Voltage=16V, Cost=1.51, Cost-10000=0.47, Supplier1=Digikey, Supplier1PN=P123389CT-ND, Supplier1PNProto=P123389TR-ND, Supplier2="Open Market"
C33 C40 C41: "390µF 35V Aluminum Polymer Capacitor Radial, Can - SMD 20mOhm 4000 Hrs @ 125°C", Manufacturer="Panasonic Electronic Components", ManufacturerPN=EEH-ZK1V391UP, Tolerance=20%, Voltage=35V, Cost=1.75, Cost-10000=0.608, Supplier1=Digikey, Supplier1PN=P125001CT-ND, Supplier1PNProto=P125001TR-ND, Supplier2="Open Market"
C47: Manufacturer="Murata Electronics", ManufacturerPN=GRM188R71E474KA12D, Package=0603, Tolerance=10%, Voltage Rating=25V, Cost=0.21, Cost-10000=0.04, CreatedBy=AT, Supplier1=Digikey, Supplier1PN=490-3291-2-ND, Supplier1PNProto=490-3291-1-ND
CN1: library part 5600200620, "Vertical SMT Header, 6-Way, 2mm Pitch", Manufacturer=Molex, Circuits (Loaded)=6, Circuits (maximum)=6, Cost=0.89, Cost-10000=0.5, ManufacturerPN=5600200620, Mounting Technology="Surface Mount", Number of Rows=1, Supplier1=Digikey, Supplier1PN=WM10866RL-ND, Supplier1PNProto=WM10866CT-ND
CN2 CN3: library part 5600200420, "Vertical SMT Header, 4-Way, 2mm Pitch", Manufacturer=Molex, Circuits (Loaded)=4, Circuits (maximum)=4, Cost=1.29, Cost-10000=1, ManufacturerPN=5600200420, Mounting Technology="Surface Mount", Number of Rows=1, Supplier1=Digikey, Supplier1PN=WM10864TR-ND, Supplier1PNProto=WM10864CT-ND
CN4: "0.5mm Pitch Easy-On FFC/FPC Connector, Horizontal, Surface Mount, ZIF, 24 Circuits", Manufacturer=Molex, Operating Temperature Range="-25°C to +130°C", Circuits (Loaded)=24, Circuits (maximum)=24, Cost=1.18, Cost-10000=0.5, ManufacturerPN=5022442430, Mounting Technology="Surface Mount", Number of Rows=1, Supplier1=Digikey, Supplier1PN=WM14450TR-ND, Supplier1PNProto=WM14450CT-ND
CN5: "5 Position Receptacle Connector 0.1\" (2.54mm) Surface Mount Gold", Manufacturer="Samtec Inc", ManufacturerPN=SSM-105-L-SV-P-TR, Cost=1.83, Cost-10000=1.16, Supplier1=Digikey, Supplier1PN=SAM14594TR-ND, Supplier1PNProto=SAM14594CT-ND
D1 D6 D7 D11 D12: "4.6V (Typ) Clamp 5.2A (8/20µs) Ipp Tvs Diode Surface Mount DFN2510A-10", Manufacturer="Nexperia USA Inc.", ManufacturerPN=PUSB3F96X, Package=DFN2510A-10, Cost=0.39, Cost-10000=0.10268, Supplier1=Digikey, Supplier1PN=1727-2030-2-ND, Supplier1PNProto=1727-2030-1-ND
D2 D3: library part "DIODE ZENER 15V 500MW SOD123F", "DIODE ZENER 15V 500MW SOD123F", Manufacturer="Taiwan Semiconductor Corporation", ManufacturerPN="BZT52B15 RHG", Package=SOD123F, Zener Voltage=15V, Cost=0.21, Cost-10000=0.04, Supplier1=Digikey, Supplier1PN=BZT52B15RHGCT-ND, Supplier1PNProto=BZT52B15RHGCT-ND
D4 D5: library part "CDSOD323-T15S TVS Diode", "CDSOD323-T15S TVS Diode", Manufacturer="Bourns Inc.", Package=SOD323, Cost=0.51, Cost-10000=0.2, ManufacturerPN=CDSOD323-T15S, Supplier1=Digikey, Supplier1PN=CDSOD323-T15STR-ND, Supplier1PNProto=CDSOD323-T15SCT-ND
D8: library part "CDSOD323-T05S TVS Diode", "CDSOD323-T05S Unidirectional TVS Diode", Manufacturer="Bourns Inc.", Package=SOD323, Cost=0.50, Cost-10000=0.2, ManufacturerPN=CDSOD323-T05S, Supplier1=Digikey, Supplier1PN=CDSOD323-T05SCT-ND, Supplier1PNProto=CDSOD323-T05SCT-ND
D9: "Zener Diode 5.1V 500mW ±2% Surface Mount SOD-123F", Manufacturer="Taiwan Semiconductor Corporation", ManufacturerPN="BZT52B5V1 RHG", Package=SOD123F, Zener Voltage=5V1, Cost=0.21, Cost-10000=0.04, Supplier1=Digikey, Supplier1PN=BZT52B5V1RHGCT-ND, Supplier1PNProto=BZT52B5V1RHGCT-ND
D10: "Diode Schottky 50V 2.7A (DC) Surface Mount DO-221AC (SlimSMA)", Manufacturer="Vishay Semiconductor Diodes Division", ManufacturerPN=VSSAF3N50-M3/6A, Package=DO221AC, Cost=0.40, Cost-10000=0.1, Supplier1=Digikey, Supplier1PN=VSSAF3N50-M3/6AGITR-ND, Supplier1PNProto=VSSAF3N50-M3/6AGICT-ND
FB1 FB3 FB4: "390 Ohms @ 100MHz 1 Power Line Ferrite Bead 1206 (3216 Metric) 2A 50mOhm", Manufacturer="Murata Electronics", ManufacturerPN=BLM31PG391SN1L, Cost=0.26, Cost-10000=0.07, Supplier1=Digikey, Supplier1PN=490-5229-2-ND, Supplier1PNProto=490-5229-1-ND
LD1: Manufacturer=Kingbright, ManufacturerPN=KPB-2012SURKCGKC, Cost=0.226, Cost-10000=0.1, Supplier1=Farnell, Supplier1PN=2079908, Supplier1PNProto=2079908
MP1 MP2 MP3 MP4: library part 9775066960R, "Wurth 9775066960R 1mm Spacer", Manufacturer="Wurth Electronics Inc", Cost=1.03, Cost-10000=0.686, ManufacturerPN=9775066960R, Supplier1=Digikey, Supplier1PN=732-10923-1-ND, Supplier1PNProto=732-10923-2-ND
R1 R3 R4 R6 R7 R9 R10 R13 R20: Flex Part Number=RES0016, Manufacturer="Samsung Electro-Mechanics America, Inc", ManufacturerPN=RC1608J152CS, Tolerance=5%, Cost=0.00089, Cost-10000=0.00077, Supplier1=Digikey, Supplier1PN=1276-5066-2-ND, Supplier1PNProto=1276-5066-1-ND, Supplier2="Open Market"
R2 R5 R8 R11: Manufacturer="Panasonic Electronic Components", ManufacturerPN=ERJ-3EKF1200V, Tolerance=1%, Cost=0.08, Cost-10000=0.00771, Supplier1=Digikey, Supplier1PN=P120HCT-ND, Supplier1PNProto=P120HCT-ND, Supplier2="Open Market"
R12 R15 R21 R22 R23 R35 R36 R37: Manufacturer="Samsung Electro-Mechanics America, Inc", ManufacturerPN=RC1608F103CS, Tolerance=1%, Cost=0.07, Cost-10000=0.00095, ProductionCost=0.0012, ProductionSupplier=LCSC, ProductionSupplierPN=C115324, Supplier1=Digikey, Supplier1PN=1276-3485-2-ND, Supplier1PNProto=1276-3485-1-ND, Supplier2="Open Market"
R14 R16 R17 R45 R48: Flex Part Number=ROL-F130-1087, Manufacturer="Samsung Electro-Mechanics America, Inc", ManufacturerPN=RC1608F472CS, Tolerance=1%, Cost=0.07, Cost-10000=0.00099, Supplier1=Digikey, Supplier1PN=1276-3502-2-ND, Supplier1PNProto=1276-3502-1-ND, Supplier2="Open Market"
R18 R19: Manufacturer="Samsung Electro-Mechanics America, Inc", ManufacturerPN=RC1608F223CS, Tolerance=1%, Cost=0.00089, Cost-10000=0.08, Supplier1=Digikey, Supplier1PN=1276-4772-2-ND, Supplier1PNProto=1276-4772-1-ND, Supplier2="Open Market"
R24 R29 R31 R34 R39 R40 R46 R47 R71 R72 R73: Manufacturer=Yageo, ManufacturerPN=RC0603FR-07100RL, Tolerance=1%, Cost=0.08, Cost-10000=0.003, ProductionCost=0.0016, ProductionSupplier=LCSC, ProductionSupplierPN=C105588, Supplier1=Digikey, Supplier1PN=311-100HRTR-ND, Supplier1PNProto=311-100HRCT-ND, Supplier2="Open Market"
R30 R41 R42 R43 R44 R70: Flex Part Number=ROL-F130-1091, Manufacturer="Samsung Electro-Mechanics America, Inc", ManufacturerPN=RC1608J000CS, Tolerance=N/A, Cost=0.07, Cost-10000=0.00053, Supplier1=Digikey, Supplier1PN=1276-3510-2-ND, Supplier1PNProto=1276-3510-1-ND, Supplier2="Open Market"
R32 R33: Manufacturer="Panasonic Electronic Components", ManufacturerPN=ERJ-8BSFR11V, Power=0.5W, Tolerance=1%, Cost=0.08, Cost-10000=0.009, Supplier1=Digikey, Supplier1PN=P17679CT-ND, Supplier1PNProto=P17679CT-ND, Supplier2="Open Market"
R74 R75: Manufacturer="Vishay Dale", ManufacturerPN=CRCW060320K0FKEC, Tolerance=1%, Cost=0.08, Cost-10000=0.00095, Supplier1=Digikey, Supplier1PN=541-2993-1-ND, Supplier1PNProto=541-2993-1-ND, Supplier2="Open Market"
SW1: library part 218-4LPST, "Dip Switch SPST 4 Position Surface Mount Slide (Standard) Actuator 25mA 24VDC", Manufacturer="CTS Electrocomponents", Cost=0.98, Cost-10000=0.52821, ManufacturerPN=218-4LPST, Supplier1=Digikey, Supplier1PN=CT2184LPST-ND, Supplier1PNProto=CT2184LPST-ND
U1 U2: "Buffer, ReDriver 2 Channel 400kHz 10-TSSOP", Manufacturer="NXP USA Inc.", ManufacturerPN=PCA9615DPJ, Supplier1=Digikey, Supplier1PN=568-11484-1-ND, Supplier1PNProto=568-11484-1-ND, Supplier2=Farnell, Supplier2PN=2775967
U3: "Bipolar Motor Driver Power MOSFET Step/Direction, UART 28-QFN (5x5)", Manufacturer="Trinamic Motion Control GmbH", Cost=2.25, Cost-10000=1.31, ManufacturerPN=TMC2209-LA-T, Supplier1=Digikey, Supplier1PN=1460-1398-2-ND, Supplier1PNProto=1460-1398-1-ND
U4: "Remote 8-Bit I2C and SMBus I/O Expander, 8 Outputs, 1.65 to 5.5 V, -40 to 85 degC, 16-pin TSSOP (PW), Green (RoHS & no Sb/Br)", Manufacturer="Texas Instruments", Cost=1.12, ManufacturerPN=TCA9554APWR, Supplier1=Digi-Key, Supplier1PN=296-28120-2-ND, Supplier1PNProto=296-28120-1-ND
U5: library part "SN74LVC2G74DCUR IC FF D-TYPE SNGL 1BIT US8", "Flip Flop 1 Element D-Type 1 Bit Positive Edge 8-VFSOP", Manufacturer="Texas Instruments", Cost=0.45, Cost-10000=0.17, ManufacturerPN=SN74LVC2G74DCUR, Supplier1=Digikey, Supplier1PN=296-12755-2-ND, Supplier1PNProto=296-12755-1-ND
U6: Manufacturer=Nexperia, ManufacturerPN=74LVC2G14GW,125, Cost=0.30, Cost-10000=0.04477, Supplier1=Digikey, Supplier1PN=1727-4217-2-ND, Supplier1PNProto=1727-4217-1-ND
U7: "Linear Voltage Regulator IC Positive Fixed 5V Output 1A 8-HTSOP-J", Manufacturer="Rohm Semiconductor", Cost=0.93, Cost-10000=0.42, ManufacturerPN=BD50FC0WEFJ-E2, Supplier1=Digikey, Supplier1PN=BD50FC0WEFJ-E2CT-ND, Supplier1PNProto=BD50FC0WEFJ-E2CT-ND
U9: "Linear Voltage Regulator IC 5V Output 1A SOT-223-4", Manufacturer="Texas Instruments", Package=SOT223, Cost=1.79, Cost-10000=0.73, ManufacturerPN=LM2940IMP-5.0/NOPB, Supplier1=Digikey, Supplier1PN=LM2940IMP-5.0/NOPBTR-ND, Supplier1PNProto=LM2940IMP-5.0/NOPBCT-ND
X1: library part "XTAL OSC XO 16.0000MHZ CMOS SMD", "XTAL OSC XO 16.0000MHZ CMOS SMD", Manufacturer=Epson, ManufacturerPN="SG5032CCN 16.000000M-HJGA3", Tolerance="+/- 50ppm", Cost=0.92, Cost-10000=0.45, Supplier1=Digikey, Supplier1PN=SER4363TR-ND, Supplier1PNProto=SER4363CT-ND

## Via types
v1: diameter 0.6, hole 0.3, Top Layer to Bottom Layer, tented both sides, 244 vias
v2: diameter 0.55, hole 0.25, Top Layer to Bottom Layer, tented both sides, 113 vias
v3: diameter 0.6, hole 0.25, Top Layer to Bottom Layer, tented both sides, 20 vias
v4: diameter 0.6, hole 0.3, Top Layer to Bottom Layer, 12 vias
v5: diameter 0.5, hole 0.2, Top Layer to Bottom Layer, 9 vias

## Nets (pads, with @x,y where several pads share a name; then routed paths per layer and width w, separated by ;. In a path a pad name is that pad's centre, name@x,y a point inside that pad or via, vN(x,y) a via of type N, cw(c..) or ccw(c..) an arc to the next point about the centre after c; other vN are vias at no path point)
C\L\R\: R40.1 U4.6 | length 6.7
  Bottom Layer w0.2: U4.6@193.675,150.65 193.675,148.725 194.1,148.3 195.2,148.3 196.354,149.454 R40.1@197.8,149.454
CLOCK: R30.1 R70.2 U3.13 | length 2.6
  Top Layer w0.2: U3.13@216.775,150.275 216.775,148.875 R30.1@216.7,148.8 R70.2@217.8,148.8
DC_5V_VIO: C1.+ C2.2 C3.2 C4.2 C5.+ C6.2 C7.2 C8.2 C22.2 C25.2 C27.2 C39.2 C46.+ C49.2 R3.2 R4.2 R9.2 R10.2 R12.1 R15.1 R16.2 R17.2 R18.2 R19.2 R24.1 R35.2 R36.2 R37.2 R45.2 R46.2 R47.2 R48.2 TP5.1 U1.1 U1.10 U2.1 U2.10 U4.16 U5.2 U5.7 U5.8 U6.5 U9.3 X1.4 | length 236
  Top Layer w0.2: R3.2@157.4,136.9 158.6,136.9 R4.2@158.7,136.8 v1(160.1,136.8) ; R9.2@157.5,150.5 v1(160.4,150.5) ; C7.2@162.9,147.6 C7.2@163.1,147.8 ; U1.10@163.175,135.7 U1.1@167.625,135.7 168.6,135.7 168.8,135.5 C4.2@171.1,135.5 C2.2@172.5,135.5 ; U2.10@163.175,149.7 164.2,149.7 164.3,149.8 ; v1(167.6,148.9) 167.6,149.675 U2.1@167.625,149.7 168.7,149.7 168.9,149.5 C8.2@171,149.5 C6.2@172.4,149.5
  Top Layer w0.4: v1(160.1,136.8) 161,136.8 161.2,137 R24.1@161.2,138.5 ; R19.2@162.8,146.4 162.9,146.5 162.9,147.6 C7.2@162.9,147.8 162.9,148.6 v1(163.2,148.9) 163.9,148.9 164.3,149.3 164.3,149.8 164.3,152.2 163.4,153.1 C1.+@163.4,154.7 ; 163.2,135.5 C3.2@163.2,134 163.2,132.2 163.5,131.9 C5.+@163.5,129.5 ; v1(167.5,134.4) U1.1@167.5,135.575 ; R18.2@168.7,146.4 168.7,147.2 169.6,148.1 R12.1@169.6,149.4 ; R16.2@172.8,161.2 R17.2@172.8,159.7 173.7,159.7 175.3,158.1 184.7,158.1 185.4,158.8 185.8,158.8 187,158.8 C27.2@187.1,158.9 ; v1(186.6,152.5) 186.6,154.1 187.1,154.6 C27.2@187.1,158.9 ; U6.5@189,158.6 189,159.2 ; R47.2@197.7,157.1 197.7,155.6 ; TP5.1@207.5,135.5 207.5,147.8 205.3,150 201.95,150 v1(201.35,150.6) 200.4,150.6 197.7,153.3 197.7,155.6 ; U9.3@210,127.8 211.4,127.8 211.6,127.6 C49.2@212.2,127.6 ; v1(216.8,139.5) 216.8,141.1 X1.4@216.8,142.6 X1.4@216.8,143 ; C27.2@187.1,158.9 187.6,158.9 188.1,159.4 188.8,159.4 189,159.2 ; 189,159.2 189.2,159.4 191.1,159.4 193.4,157.1 R45.2@194.7,157.1 194.7,156.3 195.4,155.6 197.7,155.6
  Top Layer w0.8: C49.2@212.2,127.6 212.2,131 214.3,133.1 C46.+@216.3,133.1 v1(216.3,135.6)
  Bottom Layer w0.2: v1(160.1,136.8) 162.5,134.4 v1(167.5,134.4) ; v1(160.4,150.5) 161.6,150.5 v1(163.2,148.9) ; C22.2@189.1,145 189.15,144.95 U4.16@190.425,144.95 ; C25.2@202.3,150.979 201.579,150.979 201.35,150.75 v1(201.35,150.6) U5.8@201.35,149.55 U5.7@201.35,149.05 U5.2@204.45,149.05
  Bottom Layer w0.4: v1(167.6,148.9) v1(163.2,148.9) 163.2,138.7 v1(167.5,134.4) 168.6,135.5 TP5.1@207.5,135.5 216.2,135.5 v1(216.3,135.6) 216.3,139 v1(216.8,139.5) ; C22.2@189.1,145 187.9,145 186.6,146.3 v1(186.6,152.5) 186.6,152.6 188.5,154.5 R35.2@189.9,154.5 R36.2@191.1,154.5 R37.2@192.3,154.5
DIAG-LATCHED: R39.2 U4.12 | length 6.9
  Bottom Layer w0.2: U4.12@193.025,144.95 193.025,146.425 194.1,147.5 195.2,147.5 195.7,148 R39.2@197.8,148